# Altium PCB PCB1.PcbDoc (part 2 of 3)
Units mm, origin at the board's own origin, x right, y up, seen from the top; angles counter-clockwise.
Board outline 152.4 x 101.6 mm, 2 copper layers (Top Layer, Bottom Layer); 177 components, 83 nets, 484 pads, 115 vias.
Unrouted connection lines stored in the file: 7.
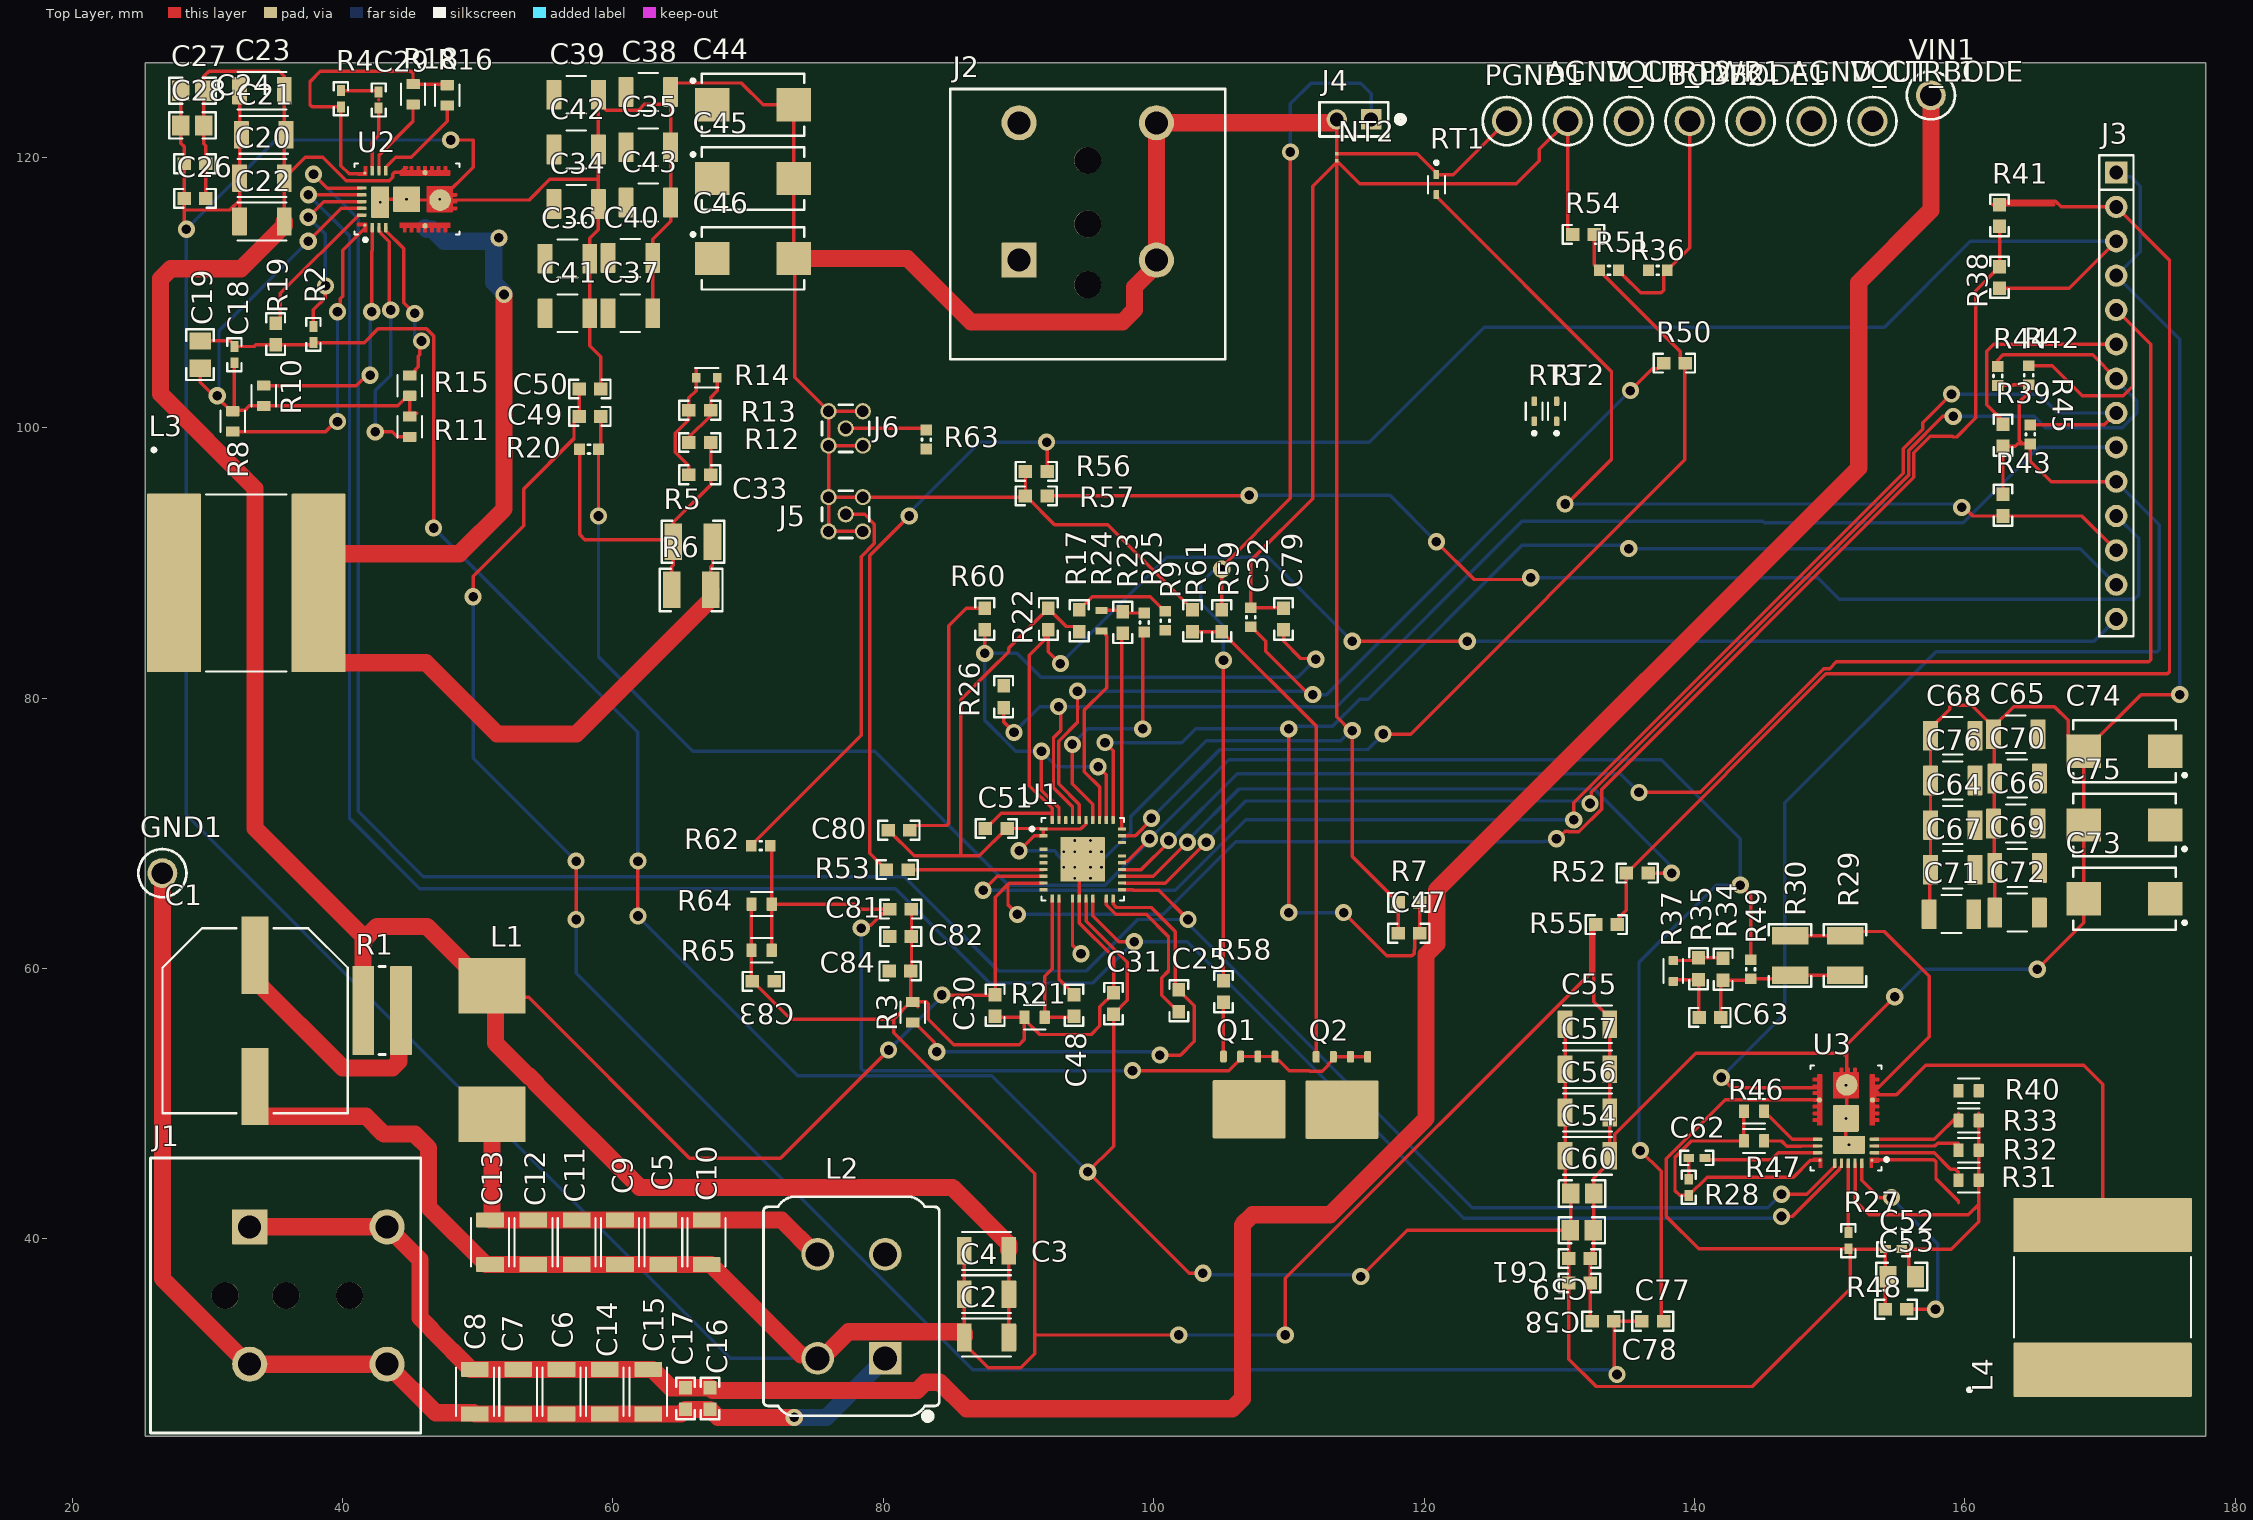
[diagram p0: Top Layer view]

## Part data (continued)
R1: library part CMP-0084352-2, "1 Ohms ±1% 2W Chip Resistor Wide 2512 (6432 Metric), 1225 Automotive AEC-Q200 Thick Film", Digikey Part Number=RCL1.00ECT-ND, Manufacturer="Vishay Dale", Mouser Part Number=71-RCL12251R00FKEG, Operating Temperature Range="-55°C to +155°C", Power_W=2W, TempCo=100ppm/°C, Tolerance_%=1%, AEC Grade="Grade 0", AEC Qualified=Yes, ComponentLink1Description=Datasheet, ComponentLink1URL=http://www.vishay.com/docs/20046/rcle3.pdf, datasheet=http://www.vishay.com/docs/20046/rcle3.pdf, Datasheet Path=datasheets/Res_RCL12251R00FKEG.pdf, Digikey Description="RES SMD 1 OHM 2W 2512 WIDE", helpURL=https://upverter.com/upn/revision/76b409d4a36248c1/, Ipc Land Pattern Name=RESC320630X70, Lead Free=Yes, Mouser Description="Thick Film Resistors - SMD 2watt 1ohm 1% 100ppm 1225", PackageReference=2512, Part Number=RCL12251R00FKEG, PartNumber=RCL12251R00FKEG, Res_ohm=1, RoHS=TRUE, Series=RCLe3, SizeZ_mm=0.8mm, Symbol Name=SYM-RCL12251R00FKEG, Technology="Thick Film", VDC_V=200V
R2 R4 R27 R28: library part CMP-0026898-3, "RES, 2.2, 5%, 0.063 W, AEC-Q200 Grade 0, 0402", Manufacturer=Vishay-Dale, Power_W=63mW, Supplier Part Number 1=541-2.2JCT-ND, TempCo="200 ppm/C", Tolerance_%=5%, Value2=0.063W, Value_Code=2R20, ValueDisplayed=2.2, AEC Category=Q200, AEC Grade=0, AEC Qualified=Y, ComponentLink1Description="Datasheet link", ComponentLink1URL=http://www.vishay.com/docs/20035/dcrcwe3.pdf, CompType=Resistor, EIA_Code=E24, MountType=SMT, PackageReference=0402, PartNumber=CRCW04022R20JNED, Res_ohm=2.2, RoHS=E, SizeArea_mm2=0.5, SizeX_mm=1, SizeY_mm=0.5, SizeZ_mm=0.6, Supplier 1=Digi-Key, Supplier 2=Newark, Supplier 3=Mouser, Supplier Part Number 2=59M6713, Supplier Part Number 3=71-CRCW0402J-2.2-E3, Technology="Thick Film", Value1=5%, VDC_V=50V
R3 R8 R10 R11 R15 R16 R18 R21 R31 R32 R33 R40 R46 R47 R64 R65: library part CMP-0122893-1, "RES Thick Film, 0Ω, , 0.33W, , 0603", Manufacturer=Vishay, Operating Temperature Range="-55°C to +155°C", Power=250mW, Power_W=330mW, AEC Grade="Grade 0", AEC Qualified=Yes, ComponentLink1Description=Datasheet, ComponentLink1URL=http://www.vishay.com/docs/20043/crcwhpe3.pdf, datasheet=http://www.vishay.com/docs/20043/crcwhpe3.pdf, Datasheet Path=datasheets/Res-CRCW06030000Z0EAHP.pdf, helpURL=https://upverter.com/upn/revision/7731518622f7bb63/, Lead Free=Yes, PackageReference=0603, Part Number=CRCW06030000Z0EAHP, PartNumber=CRCW06030000Z0EAHP, Res_ohm=0, RoHS=TRUE, Series="CRCW-HP e3", SizeZ_mm=0.55mm, Technology="Thick Film", VDC_V=75V
R5 R29: library part CMP-0083024-1, "RES, 2.49 k, 1%, 0.5 W, 1210", Manufacturer=Yageo, Power_W=500mW, TempCo="100 ppm/C", Tolerance_%=1%, Value2=0.5W, Value_Code=2k49, ValueDisplayed=2.49k, AEC Category=Q200, AEC Grade=N/A, AEC Qualified=N, ComponentLink1Description="Datasheet link", ComponentLink1URL=http://www.yageo.com/documents/recent/PYu-RC1210_51_RoHS_L_(4).pdf, CompType=Resistor, EIA_Code=E96, MountType=SMT, PackageReference=1210, PartNumber=RC1210FR-072K49L, Res_ohm=2.49k, RoHS=Y, SizeArea_mm2=8, SizeAreaWB_mm2=14.7, SizeX_mm=3.2, SizeY_mm=2.5, SizeZ_mm=1.35, Technology="Thick Film", Value1=1%, VDC_V=200V
R6 R30: library part CMP-0083034-1, "RES, 2.00 k, 1%, 0.5 W, 1210", Manufacturer=Yageo, Power_W=500mW, TempCo="100 ppm/C", Tolerance_%=1%, Value2=0.5W, Value_Code=2k00, ValueDisplayed=2.00k, AEC Category=Q200, AEC Grade=N/A, AEC Qualified=N, ComponentLink1Description="Datasheet link", ComponentLink1URL=http://www.yageo.com/documents/recent/PYu-RC1210_51_RoHS_L_(4).pdf, CompType=Resistor, EIA_Code=E96, MountType=SMT, PackageReference=1210, PartNumber=RC1210FR-072KL, Res_ohm=2k, RoHS=Y, SizeArea_mm2=8, SizeAreaWB_mm2=14.7, SizeX_mm=3.2, SizeY_mm=2.5, SizeZ_mm=1.35, Technology="Thick Film", Value1=1%, VDC_V=200V
R7 R17 R22 R26 R39 R43 R55 R56 R57: library part CMP-0021998-4, "RES, 10.0 k, 1%, 0.1 W, AEC-Q200 Grade 0, 0603", Manufacturer=Vishay-Dale, Power_W=100mW, Supplier Part Number 1=541-10.0KHCT-ND, TempCo="100 ppm/C", Tolerance_%=1%, Value2=0.1W, Value_Code=10k0, ValueDisplayed=10.0k, AEC Category=Q200, AEC Grade=0, AEC Qualified=Y, ComponentLink1Description="Datasheet link", ComponentLink1URL=http://www.vishay.com/docs/20035/dcrcwe3.pdf, CompType=Resistor, EIA_Code=E96, MountType=SMT, PackageReference=0603, PartNumber=CRCW060310K0FKEA, Res_ohm=10k, RoHS=E, SizeArea_mm2=1.28, SizeX_mm=1.6, SizeY_mm=0.8, SizeZ_mm=1, Supplier 1=Digi-Key, Supplier 2=Newark, Supplier 3=Mouser, Supplier Part Number 2=52K8062, Supplier Part Number 3=71-CRCW0603-10K-E3, Technology="Thick Film", Value1=1%, VDC_V=75V
R9 R25: library part CMP-0022486-4, "RES, 52.3 k, 1%, 0.1 W, AEC-Q200 Grade 0, 0603", Manufacturer=Vishay-Dale, Power_W=100mW, Supplier Part Number 1=541-52.3KHCT-ND, TempCo="100 ppm/C", Tolerance_%=1%, Value2=0.1W, Value_Code=52k3, ValueDisplayed=52.3k, AEC Category=Q200, AEC Grade=0, AEC Qualified=Y, ComponentLink1Description="Datasheet link", ComponentLink1URL=http://www.vishay.com/docs/20035/dcrcwe3.pdf, CompType=Resistor, EIA_Code=E96, MountType=SMT, PackageReference=0603, PartNumber=CRCW060352K3FKEA, Res_ohm=52.3k, RoHS=E, SizeArea_mm2=1.28, SizeX_mm=1.6, SizeY_mm=0.8, SizeZ_mm=1, Supplier 1=Digi-Key, Supplier 2=Newark, Supplier 3=Mouser, Supplier Part Number 2=52K8601, Supplier Part Number 3=71-CRCW0603-52.3K-E3, Technology="Thick Film", Value1=1%, VDC_V=75V
R12 R34 R60: library part CMP-0022601-4, "RES, 7.50 k, 1%, 0.1 W, AEC-Q200 Grade 0, 0603", Manufacturer=Vishay-Dale, Power_W=100mW, Supplier Part Number 1=541-7.50KHCT-ND, TempCo="100 ppm/C", Tolerance_%=1%, Value2=0.1W, Value_Code=7k50, ValueDisplayed=7.50k, AEC Category=Q200, AEC Grade=0, AEC Qualified=Y, ComponentLink1Description="Datasheet link", ComponentLink1URL=http://www.vishay.com/docs/20035/dcrcwe3.pdf, CompType=Resistor, EIA_Code=E96, MountType=SMT, PackageReference=0603, PartNumber=CRCW06037K50FKEA, Res_ohm=7.5k, RoHS=E, SizeArea_mm2=1.28, SizeX_mm=1.6, SizeY_mm=0.8, SizeZ_mm=1, Supplier 1=Digi-Key, Supplier 2=Newark, Supplier 3=Mouser, Supplier Part Number 2=52K8696, Supplier Part Number 3=71-CRCW0603-7.5K-E3, Technology="Thick Film", Value1=1%, VDC_V=75V
R13 R35: library part CMP-0025697-4, "RES, 0, 5%, 0.1 W, AEC-Q200 Grade 0, 0603", Manufacturer=Vishay-Dale, Power_W=100mW, Supplier Part Number 1=541-0.0GCT-ND, TempCo="200 ppm/C", Tolerance_%=5%, Value2=0.1W, Value_Code=0000, ValueDisplayed=0, AEC Category=Q200, AEC Grade=0, AEC Qualified=Y, ComponentLink1Description="Datasheet link", ComponentLink1URL=http://www.vishay.com/docs/20035/dcrcwe3.pdf, CompType=Resistor, EIA_Code=E24, MountType=SMT, PackageReference=0603, PartNumber=CRCW06030000Z0EA, Res_ohm=0, RoHS=E, SizeArea_mm2=1.28, SizeX_mm=1.6, SizeY_mm=0.8, SizeZ_mm=1, Supplier 1=Digi-Key, Supplier 2=Newark, Supplier 3=Mouser, Supplier Part Number 2=52K8014, Supplier Part Number 3=71-CRCW0603-0-E3, Technology="Thick Film", Value1=5%, VDC_V=75V
R14 R37: library part CMP-0095715-1, "NTC Thermistor for Temperature Sensor, Automotive, 0603, 47kΩ, 5%, 0.046mA, 5V", B Tolerance=1%, Digikey Part Number=490-NCU18WB473D60RBTR-ND, Manufacturer=Murata, Max Current=0.046mA, Mouser Part Number=81-NCU18WB473D60RB, Operating Temperature Range="-40°C to +150℃", Tolerance_%=5%, AEC Qualified=Yes, Automotive Grade="Grade 0", B 25 50=4050K, B 25 85=4108K, B 25 100=4131K, ComponentLink1Description=Datasheet, ComponentLink1URL=https://www.murata.com/en-eu/products/productdetail.aspx?partno=NCU18WB473J6SRB, datasheet=https://www.murata.com/en-eu/products/productdetail.aspx?partno=NCU18WB473J6SRB, Datasheet Path=datasheets/Res-NCU18WB473J6SRB.pdf, Digikey Description="THERMISTOR NTC", helpURL=https://upverter.com/upn/revision/bb5c53bf9c114a2d/, Lead Free=Yes, PackageReference=0603, Part Number=NCU18WB473J6SRB, PartNumber=NCU18WB473J6SRB, Res_ohm=47kΩ, RoHS=TRUE, Series=NCU18, SizeZ_mm=0.95mm, VDC_V=5V
R19 R48: library part CMP-0025817-4, "RES, 4.7 k, 5%, 0.1 W, AEC-Q200 Grade 0, 0603", Manufacturer=Vishay-Dale, Power_W=100mW, Supplier Part Number 1=541-4.7KGCT-ND, TempCo="200 ppm/C", Tolerance_%=5%, Value2=0.1W, Value_Code=4k70, ValueDisplayed=4.7k, AEC Category=Q200, AEC Grade=0, AEC Qualified=Y, ComponentLink1Description="Datasheet link", ComponentLink1URL=http://www.vishay.com/docs/20035/dcrcwe3.pdf, CompType=Resistor, EIA_Code=E24, MountType=SMT, PackageReference=0603, PartNumber=CRCW06034K70JNEA, Res_ohm=4.7k, RoHS=E, SizeArea_mm2=1.28, SizeX_mm=1.6, SizeY_mm=0.8, SizeZ_mm=1, Supplier 1=Digi-Key, Supplier 2=Newark, Supplier 3=Mouser, Supplier Part Number 2=59M6811, Supplier Part Number 3=71-CRCW0603J-4.7K-E3, Technology="Thick Film", Value1=5%, VDC_V=75V
R20 R36 R49 R62 R63: "RES, 49.9, 1%, 0.1 W, AEC-Q200 Grade 0, 0603", Manufacturer=Vishay-Dale, Power_W=100mW, Supplier Part Number 1=541-49.9HCT-ND, TempCo="100 ppm/C", Tolerance_%=1%, Value2=0.1W, Value_Code=49R9, ValueDisplayed=49.9, AEC Category=Q200, AEC Grade=0, AEC Qualified=Y, ComponentLink1Description="Datasheet link", ComponentLink1URL=http://www.vishay.com/docs/20035/dcrcwe3.pdf, CompType=Resistor, EIA_Code=E96, MountType=SMT, PackageReference=0603, PartNumber=CRCW060349R9FKEA, Res_ohm=49.9, RoHS=E, SizeArea_mm2=1.28, SizeX_mm=1.6, SizeY_mm=0.8, SizeZ_mm=1, Supplier 1=Digi-Key, Supplier 2=Newark, Supplier 3=Mouser, Supplier Part Number 2=52K8566, Supplier Part Number 3=71-CRCW0603-49.9-E3, Technology="Thick Film", Value1=1%, VDC_V=75V
R23: library part CMP-0022414-4, "RES, 41.2 k, 1%, 0.1 W, AEC-Q200 Grade 0, 0603", Manufacturer=Vishay-Dale, Power_W=100mW, Supplier Part Number 1=541-41.2KHCT-ND, TempCo="100 ppm/C", Tolerance_%=1%, Value2=0.1W, Value_Code=41k2, ValueDisplayed=41.2k, AEC Category=Q200, AEC Grade=0, AEC Qualified=Y, ComponentLink1Description="Datasheet link", ComponentLink1URL=http://www.vishay.com/docs/20035/dcrcwe3.pdf, CompType=Resistor, EIA_Code=E96, MountType=SMT, PackageReference=0603, PartNumber=CRCW060341K2FKEA, Res_ohm=41.2k, RoHS=E, SizeArea_mm2=1.28, SizeX_mm=1.6, SizeY_mm=0.8, SizeZ_mm=1, Supplier 1=Digi-Key, Supplier 2=Newark, Supplier 3=Mouser, Supplier Part Number 2=52K8513, Supplier Part Number 3=71-CRCW0603-41.2K-E3, Technology="Thick Film", Value1=1%, VDC_V=75V
R24: library part CMP-0022204-4, "RES, 20.0 k, 1%, 0.1 W, AEC-Q200 Grade 0, 0603", Manufacturer=Vishay-Dale, Power_W=100mW, Supplier Part Number 1=541-20.0KHCT-ND, TempCo="100 ppm/C", Tolerance_%=1%, Value2=0.1W, Value_Code=20k0, ValueDisplayed=20.0k, AEC Category=Q200, AEC Grade=0, AEC Qualified=Y, ComponentLink1Description="Datasheet link", ComponentLink1URL=http://www.vishay.com/docs/20035/dcrcwe3.pdf, CompType=Resistor, EIA_Code=E96, MountType=SMT, PackageReference=0603, PartNumber=CRCW060320K0FKEA, Res_ohm=20k, RoHS=E, SizeArea_mm2=1.28, SizeX_mm=1.6, SizeY_mm=0.8, SizeZ_mm=1, Supplier 1=Digi-Key, Supplier 2=Newark, Supplier 3=Mouser, Supplier Part Number 2=52K8267, Supplier Part Number 3=71-CRCW0603-20K-E3, Technology="Thick Film", Value1=1%, VDC_V=75V
R38 R41: library part CMP-0022101-4, "RES, 191 k, 1%, 0.1 W, AEC-Q200 Grade 0, 0603", Manufacturer=Vishay-Dale, Power_W=100mW, Supplier Part Number 1=541-191KHCT-ND, TempCo="100 ppm/C", Tolerance_%=1%, Value2=0.1W, Value_Code=191k, AEC Category=Q200, AEC Grade=0, AEC Qualified=Y, ComponentLink1Description="Datasheet link", ComponentLink1URL=http://www.vishay.com/docs/20035/dcrcwe3.pdf, CompType=Resistor, EIA_Code=E96, MountType=SMT, PackageReference=0603, PartNumber=CRCW0603191KFKEA, Res_ohm=191k, RoHS=E, SizeArea_mm2=1.28, SizeX_mm=1.6, SizeY_mm=0.8, SizeZ_mm=1, Supplier 1=Digi-Key, Supplier 2=Newark, Supplier 3=Mouser, Supplier Part Number 2=52K8218, Supplier Part Number 3=71-CRCW0603-191K-E3, Technology="Thick Film", Value1=1%, ValueDisplayed=191k, VDC_V=75V
R42 R44 R45: library part CMP-0021990-4, "RES, 100 k, 1%, 0.1 W, AEC-Q200 Grade 0, 0603", Manufacturer=Vishay-Dale, Power_W=100mW, Supplier Part Number 1=541-100KHCT-ND, TempCo="100 ppm/C", Tolerance_%=1%, Value2=0.1W, Value_Code=100k, AEC Category=Q200, AEC Grade=0, AEC Qualified=Y, ComponentLink1Description="Datasheet link", ComponentLink1URL=http://www.vishay.com/docs/20035/dcrcwe3.pdf, CompType=Resistor, EIA_Code=E96, MountType=SMT, PackageReference=0603, PartNumber=CRCW0603100KFKEA, Res_ohm=100k, RoHS=E, SizeArea_mm2=1.28, SizeX_mm=1.6, SizeY_mm=0.8, SizeZ_mm=1, Supplier 1=Digi-Key, Supplier 2=Newark, Supplier 3=Mouser, Supplier Part Number 2=42K3668, Supplier Part Number 3=71-CRCW0603-100K-E3, Technology="Thick Film", Value1=1%, ValueDisplayed=100k, VDC_V=75V
R50: "RES, 24.9 k, 1%, 0.1 W, 0603", Manufacturer=Yageo, Power_W=100mW, Supplier Part Number 1=311-24.9KHRCT-ND, TempCo="100 ppm/C", Tolerance_%=1%, Value2=0.1W, Value_Code=24k9, ValueDisplayed=24.9k, AEC Category=Q200, AEC Grade=N/A, AEC Qualified=N, ComponentLink1Description="Datasheet link", ComponentLink1URL=http://www.yageo.com/pdf/Pu-RC0603_51_PbFree_L_2.pdf, CompType=Resistor, EIA_Code=E96, MountType=SMT, PackageReference=0603, PartNumber=RC0603FR-0724K9L, Res_ohm=24.9k, RoHS=Y, SizeArea_mm2=1.28, SizeAreaWB_mm2=4.68, SizeX_mm=1.6, SizeY_mm=0.8, SizeZ_mm=1, Supplier 1=Digi-Key, Supplier 2=Mouser, Supplier 3=Farnell, Supplier Part Number 2=603-RC0603FR-0724K9L, Supplier Part Number 3=1799336, Technology="Thick Film", Value1=1%, VDC_V=75V
R51: "RES, 52.3 k, 1%, 0.1 W, AEC-Q200 Grade 0, 0603", Manufacturer=Vishay-Dale, Power_W=100mW, Supplier Part Number 1=541-52.3KHCT-ND, TempCo="100 ppm/C", Tolerance_%=1%, Value2=0.1W, Value_Code=52k3, ValueDisplayed=52.3k, AEC Category=Q200, AEC Grade=0, AEC Qualified=Y, ComponentLink1Description="Datasheet link", ComponentLink1URL=http://www.vishay.com/docs/20035/dcrcwe3.pdf, CompType=Resistor, EIA_Code=E96, MountType=SMT, PackageReference=0603, PartNumber=CRCW060352K3FKEA, Res_ohm=52.3k, RoHS=E, SizeArea_mm2=1.28, SizeX_mm=1.6, SizeY_mm=0.8, SizeZ_mm=1, Supplier 1=Digi-Key, Supplier 2=Newark, Supplier 3=Mouser, Supplier Part Number 2=52K8601, Supplier Part Number 3=71-CRCW0603-52.3K-E3, Technology="Thick Film", Value1=1%, VDC_V=75V
R52 R53: library part CMP-0022458-4, "RES, 4.99 k, 1%, 0.1 W, AEC-Q200 Grade 0, 0603", Manufacturer=Vishay-Dale, Power_W=100mW, Supplier Part Number 1=541-4.99KHCT-ND, TempCo="100 ppm/C", Tolerance_%=1%, Value2=0.1W, Value_Code=4k99, ValueDisplayed=4.99k, AEC Category=Q200, AEC Grade=0, AEC Qualified=Y, ComponentLink1Description="Datasheet link", ComponentLink1URL=http://www.vishay.com/docs/20035/dcrcwe3.pdf, CompType=Resistor, EIA_Code=E96, MountType=SMT, PackageReference=0603, PartNumber=CRCW06034K99FKEA, Res_ohm=4.99k, RoHS=E, SizeArea_mm2=1.28, SizeX_mm=1.6, SizeY_mm=0.8, SizeZ_mm=1, Supplier 1=Digi-Key, Supplier 2=Newark, Supplier 3=Mouser, Supplier Part Number 2=52K8500, Supplier Part Number 3=71-CRCW0603-4.99K-E3, Technology="Thick Film", Value1=1%, VDC_V=75V
R54 R61: "RES, 10.0 k, 1%, 0.1 W, AEC-Q200 Grade 0, 0603", Manufacturer=Vishay-Dale, Power_W=100mW, Supplier Part Number 1=541-10.0KHCT-ND, TempCo="100 ppm/C", Tolerance_%=1%, Value2=0.1W, Value_Code=10k0, ValueDisplayed=10.0k, AEC Category=Q200, AEC Grade=0, AEC Qualified=Y, ComponentLink1Description="Datasheet link", ComponentLink1URL=http://www.vishay.com/docs/20035/dcrcwe3.pdf, CompType=Resistor, EIA_Code=E96, MountType=SMT, PackageReference=0603, PartNumber=CRCW060310K0FKEA, Res_ohm=10k, RoHS=E, SizeArea_mm2=1.28, SizeX_mm=1.6, SizeY_mm=0.8, SizeZ_mm=1, Supplier 1=Digi-Key, Supplier 2=Newark, Supplier 3=Mouser, Supplier Part Number 2=52K8062, Supplier Part Number 3=71-CRCW0603-10K-E3, Technology="Thick Film", Value1=1%, VDC_V=75V
R58 R59: "RES, 1.0, 5%, 0.1 W, AEC-Q200 Grade 0, 0603", Manufacturer=Vishay-Dale, Power_W=100mW, Supplier Part Number 1=541-1.0GCT-ND, TempCo="200 ppm/C", Tolerance_%=5%, Value2=0.1W, Value_Code=1R00, ValueDisplayed=1.0, AEC Category=Q200, AEC Grade=0, AEC Qualified=Y, ComponentLink1Description="Datasheet link", ComponentLink1URL=http://www.vishay.com/docs/20035/dcrcwe3.pdf, CompType=Resistor, EIA_Code=E24, MountType=SMT, PackageReference=0603, PartNumber=CRCW06031R00JNEA, Res_ohm=1, RoHS=E, SizeArea_mm2=1.28, SizeX_mm=1.6, SizeY_mm=0.8, SizeZ_mm=1, Supplier 1=Digi-Key, Supplier 2=Newark, Supplier 3=Mouser, Supplier Part Number 2=59M6759, Supplier Part Number 3=71-CRCW0603J-1-E3, Technology="Thick Film", Value1=5%, VDC_V=75V
RT1: library part CMP-0123120-1, "Automotive ±1% tolerance 10kΩ linear thermistor available in an 0402 package option 2-SOT-5X3 -40 to 150", Digikey Part Number=296-TMP6131QDYARQ1CT-ND, Manufacturer="Texas Instruments", Max Current=400uA, Mouser Part Number=595-TMP6131QDYARQ1, Operating Temperature Range="-40°C to +150°C", TempCo=6400ppm/°C, Tolerance_%=1%, AEC Grade="Grade 0", AEC Qualified=Yes, ComponentLink1Description=Datasheet, ComponentLink1URL=https://www.ti.com/lit/ds/symlink/tmp61-q1.pdf, datasheet=https://www.ti.com/lit/ds/symlink/tmp61-q1.pdf, Datasheet Date=2023-11, Datasheet Path=datasheets/Res-TMP6131QDYARQ1.pdf, Datasheet Version=SNIS210G, Digikey Description="SENSOR PTC 10KOHM 1% SOT5X3", helpURL=https://upverter.com/upn/revision/9d6f33fa8cb389e1/, Lead Free=Yes, Mouser Description="Automotive, 1%, 10-kO linear thermistor in 0402, 0603/0805 and through hole packages 2-SOT-5X3 -40 to 150", PackageReference=SOT-523, Part Number=TMP6131QDYARQ1, PartNumber=TMP6131QDYARQ1, Res_ohm=10kΩ, RoHS=TRUE, Series=TMP61, SizeZ_mm=0.77mm, TaMax_C=+150°C, TaMin_C=-40°C, TJmax_C=+155°C, VDC_V=5.5V
RT2 RT3: "Automotive ±1% tolerance 10kO linear thermistor available in an 0402 package option 2-SOT-5X3 -40 to 150", Digikey Part Number=296-TMP6131QDYARQ1CT-ND, Manufacturer="Texas Instruments", Max Current=400uA, Mouser Part Number=595-TMP6131QDYARQ1, Operating Temperature Range="-40°C to +150°C", TempCo=6400ppm/°C, Tolerance_%=1%, AEC Grade="Grade 0", AEC Qualified=Yes, ComponentLink1Description=Datasheet, ComponentLink1URL=https://www.ti.com/lit/ds/symlink/tmp61-q1.pdf, datasheet=https://www.ti.com/lit/ds/symlink/tmp61-q1.pdf, Datasheet Date=2023-11, Datasheet Path=datasheets/Res-TMP6131QDYARQ1.pdf, Datasheet Version=SNIS210G, Digikey Description="SENSOR PTC 10KOHM 1% SOT5X3", helpURL=https://upverter.com/upn/revision/9d6f33fa8cb389e1/, Lead Free=Yes, Mouser Description="Automotive, 1%, 10-kO linear thermistor in 0402, 0603/0805 and through hole packages 2-SOT-5X3 -40 to 150", PackageReference=SOT-523, Part Number=TMP6131QDYARQ1, PartNumber=TMP6131QDYARQ1, Res_ohm=10kΩ, RoHS=TRUE, Series=TMP61, SizeZ_mm=0.77mm, TaMax_C=+150°C, TaMin_C=-40°C, TJmax_C=+155°C, VDC_V=5.5V
U1: library part CMP-0122321-1, "Automotive, 4-V to 80-V, Functional Safety-Compliant, Dual Synchronous Buck Controller With Low IQ", Manufacturer="Texas Instruments", Max Supply Voltage=80V, Min Supply Voltage=4V, Nominal Supply Current=130uA, Operating Temperature Range="-40°C to +150°C", Output Voltage=0.8-60V, Switching Frequency=100-2200kHz, AEC Grade="Grade 1", AEC Qualified=Yes, Datasheet Path=datasheets/IC-LM5137FDQRHARQ1.pdf, helpURL=https://upverter.com/upn/revision/27a3924f597904bd/, Max Duty Cycle=100%, Number Of Outputs=2, Output Type=AdjustableProgrammable, PackageReference=VQFN36, Part Number=LM5137FDQRHARQ1, PartNumber=LM5137FDQRHARQ1, RoHS=UNKNOWN, SizeZ_mm=1mm, Standoff Height=0mm, Switching Topology=Buck, TaMax_C=+150°C, TaMin_C=-40°C, TJmax_C=+150°C
U2 U3: library part CMP-0121493-2, "100-V, 53-A GaN Half-Bridge Power Stage", Manufacturer="Texas Instruments", Max Supply Voltage=5.25V, Min Supply Voltage=4.75V, Nominal Supply Current=12mA, Operating Temperature Range="-40°C to +150°C", AEC Category=Q200, AEC Qualified=No, ComponentLink1Description="Datasheet Link", ComponentLink1URL=http://www.ti.com/lit/ds/symlink/GPN.pdf, ComponentLink2Description="Product Folder", ComponentLink2URL=http://www.ti.com/product/GPN, ComponentLink3Description="Online Datasheet", ComponentLink3URL=http://www.ti.com/product/GPN/datasheet, CompType=IC, Datasheet Path=datasheets/IC-LMG2100R026VBNR.pdf, helpURL=https://upverter.com/upn/revision/383ae964fb140d4d/, Number Of Drivers=2, Number Of Outputs=1, PackageReference=VQFN-FCRLF16, Part Number=LMG2100R026VBNR, PartNumber=LMG2100R026VBNR, Propagation Delay=29.5ns, RoHS=UNKNOWN, SizeZ_mm=0.85mm, Standoff Height=0mm, TJmax_C=+150°C
VIN1: library part CMP-0055147-1, "Test Point, Multipurpose, Red, TH", Color=Red, Manufacturer=Keystone, PartNumber=5010, Supplier Part Number 1=36-5010-ND, CNHeader=FALSE, ComponentLink1Description="Datasheet URL", ComponentLink1URL=http://www.keyelco.com/userAssets/file/M60-2p60.pdf, CompType="Test Point", ContactFinish=Silver, CT=TRUE, Green_EU RoHS=Passed, Green_EU RoHS-2=Incomplete, Green_Lifecycle=Active, Green_REACh=Passed, LatestRevisionDate=26/05/2017, MountType=TH, PackageReference="Red Multipurpose Testpoint", Publisher="Texas Instruments", RoHS=Y, Supplier 1=Digi-Key, Supplier 2=Mouser, Supplier Part Number 2=534-5010
VOUT_BODE VOUT_PWR1: library part 5010, "Test Point, Multipurpose, Red, TH", Color=Red, Manufacturer=Keystone, Supplier Part Number 1=36-5010-ND, CNHeader=FALSE, ComponentLink1Description="Datasheet URL", ComponentLink1URL=http://www.keyelco.com/userAssets/file/M60-2p60.pdf, CompType="Test Point", ContactFinish=Silver, CT=TRUE, Green_EU RoHS=Passed, Green_EU RoHS-2=Incomplete, Green_Lifecycle=Active, Green_REACh=Passed, LatestRevisionDate=26/05/2017, MountType=TH, PackageReference="Red Multipurpose Testpoint", PartNumber=5010, Publisher="Texas Instruments", RoHS=Y, Supplier 1=Digi-Key, Supplier 2=Mouser, Supplier Part Number 2=534-5010

## Via types
v1: diameter 1.27, hole 0.711, Top Layer to Bottom Layer, 97 vias
v2: diameter 0.5, hole 0.2, Top Layer to Bottom Layer, 18 vias